# Altium PCB OpenRex_V1I1_PCB.PcbDoc (part 7 of 12)
Units mm, origin at the board's own origin, x right, y up, seen from the top; angles counter-clockwise.
Board outline 70 x 95 mm, 10 copper layers (L1, L2, L3, L4 (PWR), L5 (PWR), L6 (PWR), L7 (PWR), L8, L9, L10), stack 1.632 mm thick; 1080 components, 708 nets, 3831 pads, 2373 vias.
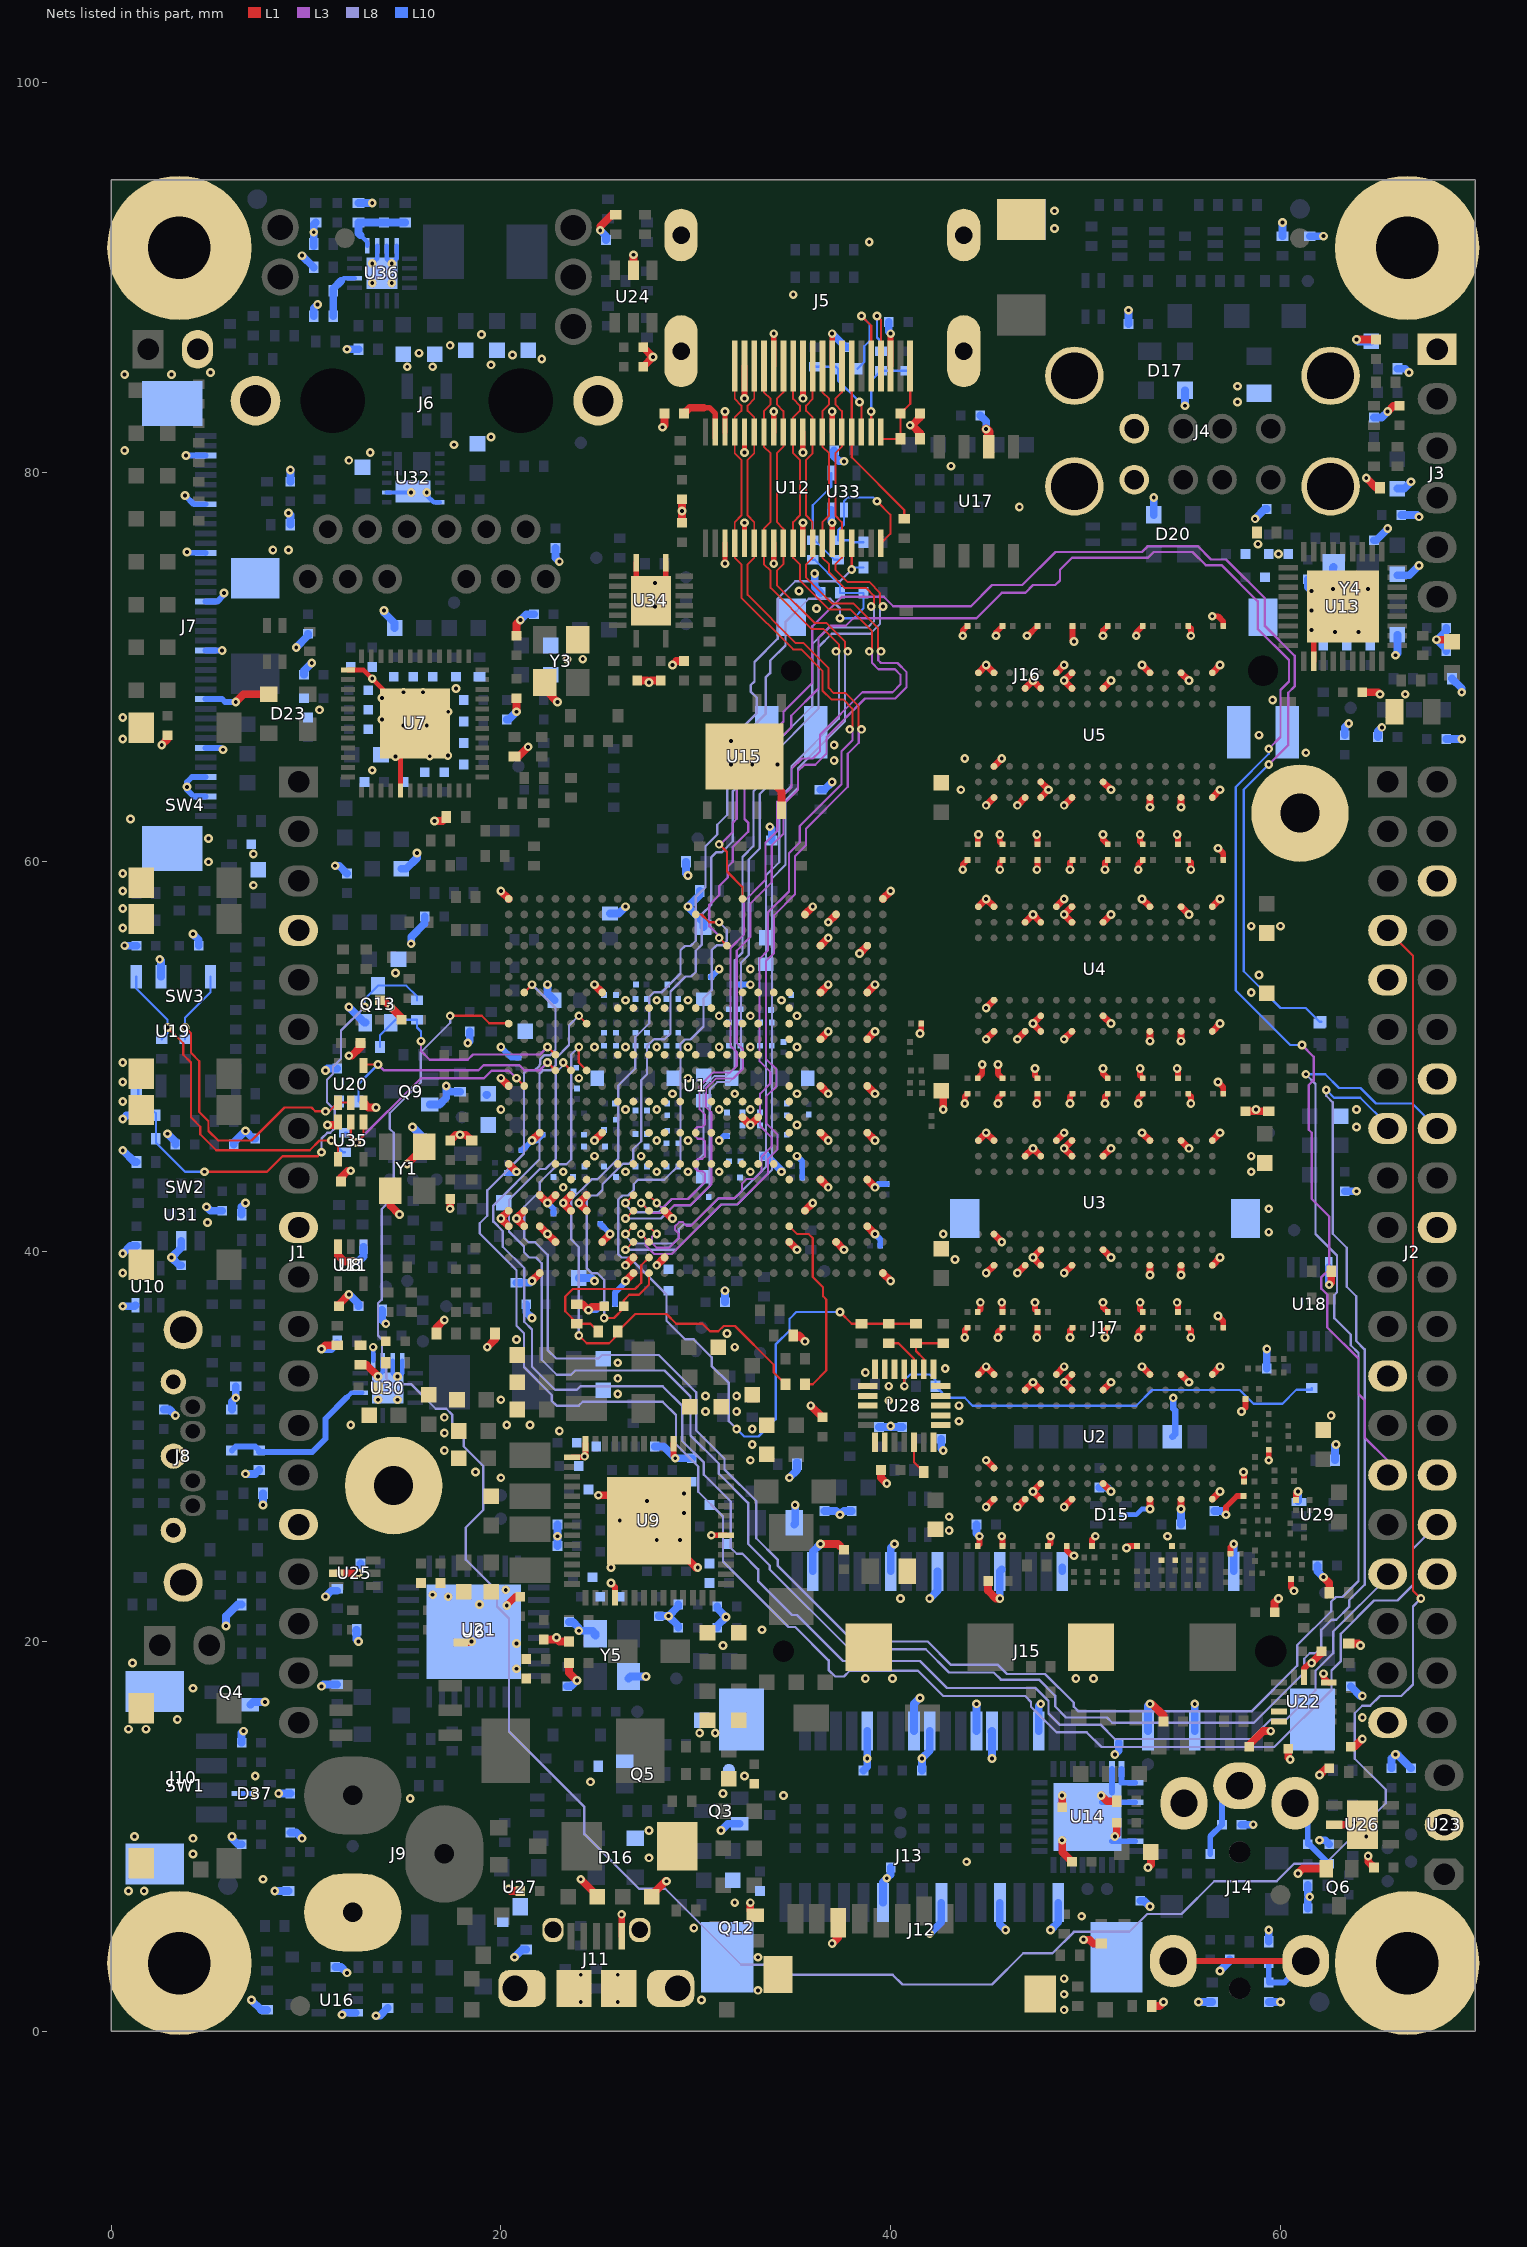
[diagram p15: the nets of this part, all layers, seen from the top]

## Via types
v1: diameter 0.45, hole 0.2, L1 to L10, tented both sides, 2369 vias
v2: diameter 1, hole 0.5, L1 to L10, tented top, 4 vias

## Nets (pads, with @x,y where several pads share a name; then routed paths per layer and width w, separated by ;. In a path a pad name is that pad's centre, name@x,y a point inside that pad or via, vN(x,y) a via of type N, cw(c..) or ccw(c..) an arc to the next point about the centre after c; other vN are vias at no path point) (continued)
FB_1V375: C410.1 R336.1 R339.2 U30.9 | length 0.7
  L10 w0.23: U30.9@13.45,34.4 U30.9@13.45,34.41 v1(13.45,35.1)
FB_3V3_HDR: C432.1 R399.1 R402.2 U36.9 | length 3.8
  L10 w0.23: 12.8,92.15 13.15,91.8 U36.9@13.15,91.61
  L10 w0.4: 12.8,92.15 12.7,92.25 R402.2@12.7,92.8 C432.1@14,92.8 R399.1@15.1,92.8
FIL_HP_OUTL: C287.1 FB22.2 J14.3 J14.4 | length 10.3
  L1 w0.3: J14.3@54.5,3.6 J14.4@61.3,3.6
  L10 w0.3: FB22.2@59.4,3.6 FB22.2@59.4,3.5 C287.1@59.4,2.5 60.2,2.5 J14.4@61.3,3.6
FIL_HP_OUTR: C286.1 FB21.2 J14.2 | length 3.9
  L10 w0.3: J14.2@60.75,11.7 61.4,11.05 FB21.2@61.4,9.6 61.479,9.6 62.479,8.6 C286.1@62.5,8.6
FIL_MIC_IN: C295.1 FB18.2 J14.1 | length 4.1
  L10 w0.3: FB18.2@56.4,9.1 56.4,10 C295.1@57,10.6 57,11.7 J14.1@57.9,12.6
FLEXCAN1_RX: R412.1 U1.D14 U20.4 | length 12.8
  L1 w0.114: U20.4@12.95,49.55 13,49.6 v1(13.7,49.6) ; v1(22.4,49.7) U1.D14@22.8,49.3
  L3 w0.12: v1(13.7,49.6) 14,49.3 18.845,49.3 19.11,49.565 20.95,49.565 21.2,49.315 22.015,49.315 v1(22.4,49.7)
  L10 w0.114: R412.1@12.7,47.7 12.7,48.6 v1(13.7,49.6)
FLEXCAN1_RX_BUFF: R117.1 R412.2 U19.4 U20.1 U20.2 | length 18.9
  L1 w0.114: v1(3.8,51.5) 4.1,51.2 4.1,50.2 4.53,49.77 4.53,47.17 5.004,46.696 5.004,46.196 5.496,45.704 7.204,45.704 8.9,47.4 10.28,47.4 10.48,47.2 v1(11,47.2) 11.2,47.2 U20.1@11.65,47.65 U20.2@12.3,47.65
  L10 w0.114: R117.1@3.8,50.9 v1(3.8,51.5) 3.8,52 5.105,53.305 U19.4@5.105,54.1 ; v1(11,47.2) 11.2,47.2 R412.2@11.7,47.7
FLEXCAN1_STBY: Q13.1 R280.1 R413.1 U1.D15 | length 12
  L1 w0.114: v1(22.4,50.5) U1.D15@22.8,50.1
  L3 w0.12: v1(15.9,50.8) 15.9,50.3 16.355,49.845 18.3,49.845 18.57,50.115 22.015,50.115 v1(22.4,50.5)
  L10 w0.114: R280.1@13.8,50.5 13.8,51.1 14.6,51.9 R413.1@15.7,51.9 15.7,51.5 15.9,51.3 v1(15.9,50.8)
FLEXCAN1_STBY_Q: Q13.3 R250.2 R382.1 R413.2 U19.8 | length 25.4
  L1 w0.114: v1(4.8,44.1) 8,44.1 8.8,44.9 10.6,44.9 v1(10.8,45.1)
  L8 w0.12: v1(10.8,45.1) 10.8,45.8 11.1,46.1 11.244,46.1 11.485,46.341 11.485,47.259 11.078,47.667 11.078,48.822 11.385,49.129 11.385,49.485 11.8,49.9 11.8,51.344 13,52.544 v1(13,52.55)
  L10 w0.114: U19.8@1.395,48.5 1.395,48.005 2.3,47.1 R382.1@2.3,45.8 2.3,45.6 3.8,44.1 v1(4.8,44.1) ; v1(13,52.55) 13,52.95 Q13.3@13.7,53.65 15.15,53.65 15.7,53.1 R413.2@15.7,52.9
FLEXCAN1_TX: R411.1 U1.B13 U35.1 U35.2 | length 13.6
  L1 w0.114: U35.2@12.3,46.65 12.3,45.9 v1(12.6,45.6) 12.95,45.95 U35.1@12.95,46.65 ; v1(20.8,48.9) U1.B13@21.2,48.5
  L3 w0.12: v1(12.6,45.6) 15.9,48.9 19.135,48.9 19.52,49.285 20.415,49.285 v1(20.8,48.9)
  L10 w0.114: R411.1@12,46.1 12.1,46.1 v1(12.6,45.6)
FLEXCAN1_TX_BUFF: R41.1 R411.2 U19.1 U35.4 | length 19.5
  L1 w0.114: v1(2.9,51.5) 3.7,50.7 3.7,50.1 4.1,49.7 4.1,46.896 4.58,46.416 4.58,46.02 5.4,45.2 10.2,45.2 10.7,45.7 v1(11.3,45.7) 11.65,45.35 U35.4@11.65,44.75
  L10 w0.114: U19.1@1.295,54.1 1.295,53.505 2.9,51.9 v1(2.9,51.5) 2.9,51.2 R41.1@2.6,50.9 ; v1(11.3,45.7) 11.9,45.1 R411.2@12,45.1
FLEXCAN2_RX: J2.16 U1.F14 | length 110.1
  L1 w0.114: v1(24,50.5) 24,49.7 U1.F14@24.4,49.3
  L8 w0.12: v1(24,50.5) 23.615,50.115 23.615,44.741 23.359,44.485 22.925,44.485 22,43.56 22,43.1 21.2,42.3 21.2,40.7 21.415,40.485 21.759,40.485 22.4,39.844 22.4,34.956 22.841,34.515 25.015,34.515 25.2,34.7 28.1,34.7 30.018,32.782 30.018,30.838 31.475,29.38 31.475,28.825 33.1,27.2 33.1,25.3 34.2,24.2 34.2,23.9 38.1,20 41.9,20 43.1,18.8 45.5,18.8 45.965,18.335 47.921,18.335 49.4,16.856 49.4,16.656 49.641,16.415 58.515,16.415 60.86,18.76 60.86,19.816 62.6,21.556 62.6,22.044 62.841,22.285 63.185,22.285 64,23.1 64,34.8 63.6,35.2 63.6,35.744 62.754,36.591 62.754,37.769 62.9,37.915 62.9,39.8 61.8,40.9 61.8,48.6 v1(61.3,49.1)
  L10 w0.114: v1(61.3,49.1) 62.3,49.1 63,48.4 64.1,48.4 64.9,47.6 66.76,47.6 J2.16@68.04,46.32
FLEXCAN2_TX: J2.15 U1.E14 | length 105.6
  L1 w0.114: v1(23.2,49.7) U1.E14@23.6,49.3
  L8 w0.12: v1(23.2,49.7) 23.2,49.56 22.815,49.175 22.815,44.771 22.289,44.244 22,44.244 20.415,42.659 20.415,41.029 21.185,40.259 21.185,39.971 21.456,39.7 21.8,39.7 22.1,39.4 22.1,34.456 22.871,33.685 23.6,33.685 23.815,33.9 28.4,33.9 29.728,32.572 29.728,30.572 31.185,29.115 31.185,28.609 32.685,27.109 32.685,25.015 33.8,23.9 33.8,23.7 37.9,19.6 41.8,19.6 42.99,18.41 45.29,18.41 45.655,18.045 47.605,18.045 48.44,17.21 48.44,16.66 49,16.1 51.1,16.1 51.365,15.835 58.635,15.835 61.215,18.415 61.215,19.115 61.5,19.4 61.8,19.4 62.1,19.7 62.1,20.6 62.615,21.115 62.859,21.115 63.52,21.776 63.52,22.12 64.315,22.915 64.315,34.985 63.885,35.415 63.885,37.715 63.4,38.2 63.4,40.2 62.685,40.915 62.685,47.659 62.35,47.994 v1(62.35,48.3)
  L10 w0.114: v1(62.35,48.3) 62.75,47.9 64.094,47.9 65.5,46.494 J2.15@65.5,46.32
FS_1V375: R334.1 R337.2 U30.6 | length 8.8
  L10 w0.23: 12.1,32.528 12.322,32.75 U30.6@12.79,32.75 U30.6@12.9,32.75
  L10 w0.3: R334.1@6.2,29.8 6.4,30 7.4,30 R337.2@7.6,29.8 7.6,29.725 10.325,29.725 11,30.4 11,31.428 12.1,32.528
FS_3V3_HDR: R397.1 R400.2 U36.6 | length 2.8
  L10 w0.23: 11.8,89.8 11.95,89.95 U36.6@12.49,89.95 U36.6@12.5,89.95
  L10 w0.4: R400.2@11.4,88 R397.1@11.4,89.4 ; R397.1@11.4,89.3 R397.1@11.4,89.4 ; 11.8,89.8 R397.1@11.4,89.4
GND: C1.2 C2.2 C3.2 C4.2 C5.2 C6.2 C7.2 C8.2 C9.2 C10.2 C11.2 C12.2 C19.2 C21.2 C22.2 C23.2 C24.2 C25.2 C26.2 C27.2 C28.2 C29.2 C30.2 C31.2 C32.2 C33.2 C34.2 C35.2 C36.2 C37.2 C38.2 C39.2 C40.2 C41.2 C42.2 C43.2 C44.2 C45.2 C46.2 C47.2 C48.2 C49.2 C50.2 C51.2 C52.2 C53.2 C54.2 C55.2 C56.2 C57.2 C58.2 C59.2 C60.2 C61.2 C62.2 C64.2 C68.2 C73.2 C75.2 C76.2 C77.2 C78.2 C79.2 C80.2 C81.2 C82.2 C83.2 C84.2 C87.2 C88.2 C89.2 C90.2 C91.2 C92.2 C93.2 C94.2 C95.2 C96.2 C97.2 C98.2 C99.2 C100.2 C101.2 C102.2 C103.2 C104.2 C105.2 C106.2 C107.2 C108.2 C109.2 C110.2 C111.2 C112.2 C113.2 C114.2 C115.2 C116.2 C117.2 C118.2 C119.2 C120.2 C121.2 C122.2 C123.2 C124.2 C125.2 C126.2 C127.2 C128.2 C129.2 C130.2 C131.2 C132.2 C133.2 C134.2 C135.2 C136.2 C137.2 C138.2 C139.2 C140.2 C141.2 C142.2 C143.2 C144.2 C145.2 C146.2 C147.2 C148.2 C149.2 C150.2 C151.2 C152.2 C153.2 C154.2 C155.2 C156.2 C157.2 C158.2 C159.2 C160.2 C161.2 C162.2 C163.2 C164.2 C165.2 C166.2 C167.2 C168.2 C169.2 C170.2 C171.2 C172.2 C173.2 C174.2 C175.2 C176.2 C177.2 C178.2 C179.2 C180.2 C181.2 C182.2 C183.2 C184.2 C185.2 C186.2 C187.2 C188.2 C189.2 C190.2 C191.2 C192.2 C193.2 C194.2 C195.2 C196.2 C197.2 C198.2 C199.2 C200.2 C201.2 C202.2 C203.2 C204.2 C205.2 C207.2 C208.2 C209.2 C210.2 C211.2 C212.2 C213.2 C214.2 C215.2 C216.2 C217.2 C218.2 C219.2 C220.2 C221.2 C222.2 C223.1 C224.1 C225.2 C226.2 C227.2 C228.2 C229.2 C230.1 C231.2 C232.2 C233.2 C234.2 C235.2 C236.2 C237.2 C238.2 C239.2 C240.2 C242.2 C243.2 C244.2 C245.1 C246.2 C247.2 C248.2 C249.2 C250.2 C251.1 C252.2 C253.2 C254.2 C255.2 C256.2 C257.2 C258.2 C259.2 C260.2 C261.2 C262.2 C263.2 C264.2 C265.2 C266.2 C267.2 C268.2 C269.2 C270.2 C271.1 C272.1 C273.2 C274.1 C275.1 C276.1 C277.2 C278.2 C279.2 C280.2 C281.2 C282.2 C283.2 C286.2 C287.2 C288.2 C289.2 C292.2 C293.2 C295.2 C296.2 C297.2 C298.1 C299.2 C300.2 C301.2 C302.2 C303.2 C304.2 C305.2 C306.2 C307.2 C308.2 C309.1 C310.2 C311.2 C312.2 C313.2 C314.2 C315.2 C316.2 C317.2 C318.2 C319.2 C320.2 C321.2 C324.1 C325.2 C326.1 C329.2 C330.2 C331.2 C332.2 C333.2 C334.2 C335.2 C336.2 C337.2 C338.2 C339.2 C341.2 C342.2 C343.2 C344.2 C345.2 C346.2 C347.2 C348.2 C349.2 C350.2 C351.2 C352.2 C353.2 C354.2 C355.2 C356.2 C357.2 C358.2 C359.2 C360.2 C361.2 C362.2 C363.2 C364.2 C365.2 C366.2 C367.2 C368.2 C369.2 C370.2 C371.2 C372.2 C373.2 C374.2 C375.2 C376.2 C377.2 C378.2 C379.2 C380.2 C381.2 C382.2 C383.2 C384.2 C385.2 C386.2 C387.2 C388.2 C389.2 C391.2 C393.2 C394.2 C395.2 C396.2 C397.2 C398.2 C399.2 C400.2 C401.2 C402.2 C403.2 C404.2 C405.2 C406.2 C407.2 C408.2 C409.2 C412.2 C413.2 C414.2 C415.2 C416.2 C417.2 C418.2 C419.2 C420.2 C421.2 C422.2 C423.2 C424.2 C425.2 C426.2 C427.2 C428.2 C429.2 C430.2 C431.2 C434.2 C435.2 C436.2 C437.2 D4.2 D8.2 D12.1 D15.2 D16.3 D17.3 D19.2 D20.3 D23.3 D31.2 D32.2 D37.2 J1.4 J1.10 J1.16 J2.6 J2.9 J2.14 J2.20 J2.25 J2.30 J2.34 J2.39 J3.1 J4.4 J4.8 J4.9 J4.10 J4.11 J4.12 J5.2 J5.5 J5.8 J5.11 J5.17 J5.MTG1 J5.MTG2 J5.MTG3 J5.MTG4 J6.18 J6.19 J7.3 J7.5 J7.8 J7.13 J7.18 J7.23 J7.28 J7.33 J7.38 J7.41 J7.42 J8.1 J8.4 J8.7 J8.8 J8.9 J9.2 J10.5 J10.6 J11.5 J11.6 J11.7 J11.8 J11.9 J11.10 J11.11 J12.1 J12.4 J12.7 J12.10 J12.16 J12.17 J13.6 J13.11 J13.12 J14.6 J15.4 J15.9 J15.15 J15.18 J15.21 J15.26 J15.27 J15.29 J15.34 J15.35 J15.37 J15.40 J15.43 J15.50 J15.53 J15.54 J16.1 J16.2 J16.3 J16.4 J16.5 J16.6 J17.C5 J17.G1 J17.G2 JP2.2 MH1.1 MH2.1 MH3.1 MH4.1 MH5.1 MH6.1 Q3.2 Q4.2 Q5.2 Q6.2 Q9.2 Q12.2 Q13.2 R4.1 R5.1 R6.1 R7.1 R8.1 R9.1 R10.2 R16.1 R17.1 R20.2 R26.1 R30.1 R32.1 R37.1 R47.1 R54.1 R56.1 R58.1 R61.1 R84.2 R99.1 R101.1 R102.1 R115.2 R139.1 R144.1 R157.1 R160.1 R163.1 R164.1 R166.1 R174.1 R175.1 R182.2 R191.1 R199.1 R205.1 R210.1 R211.1 R216.2 R220.1 R221.1 R222.2 R223.1 R224.1 R230.1 R231.1 R232.1 R233.1 R234.2 R237.1 R239.1 R250.1 R259.1 R265.1 R274.1 R296.1 R301.1 R303.1 R305.1 R306.1 R307.1 R308.1 R309.1 R310.1 R311.2 R316.2 R337.1 R338.1 R339.1 R342.1 R343.1 R344.1 R346.1 R393.1 R394.1 R395.1 R396.1 R400.1 R401.1 R402.1 R406.1 R407.1 R408.1 SW1.3 SW1.4 SW2.3 SW2.4 SW3.3 SW3.4 SW4.3 SW4.4 TP10.1 U1.A4 U1.A5 U1.A8 U1.A13 U1.A25 U1.AA7 U1.AA10 U1.AA13 U1.AA16 U1.AA19 U1.AA22 U1.AB3 U1.AB24 U1.AD4 U1.AD7 U1.AD10 U1.AD13 U1.AD16 U1.AD19 U1.AD22 U1.AE1 U1.AE25 U1.B4 U1.B5 U1.C1 U1.C4 U1.C6 U1.C10 U1.D3 U1.D6 U1.D8 U1.E5 U1.E6 U1.E7 U1.F5 U1.F6 U1.F7 U1.F8 U1.G3 U1.G10 U1.G19 U1.H8 U1.H12 U1.H15 U1.H18 U1.J2 U1.J8 U1.J12 U1.J15 U1.J18 U1.K8 U1.K10 U1.K12 U1.K15 U1.K18 U1.L2 U1.L5 U1.L8 U1.L10 U1.L12 U1.L15 U1.L18 U1.M8 U1.M10 U1.M12 U1.M15 U1.M18 U1.N8 U1.N10 U1.N15 U1.N18 U1.P8 U1.P10 U1.P12 U1.P15 U1.P18 U1.R8 U1.R12 U1.R15 U1.R17 U1.T8 U1.T11 U1.T12 U1.T15 U1.T17 U1.T19 U1.U8 U1.U11 U1.U12 U1.U15 U1.U17 U1.U19 U1.V8 U1.V19 U1.W3 U1.W7 U1.W8 U1.W9 U1.W10 U1.W11 U1.W12 U1.W13 U1.W15 U1.W16 U1.W17 U1.W18 U1.W19 U1.Y5 U1.Y24 U2.A9 U2.B1 U2.B3 U2.B9 U2.D1 U2.D8 U2.E1 U2.E2 U2.E8 U2.F9 U2.G1 U2.G8 U2.G9 U2.J2 U2.J8 U2.M1 U2.M9 U2.P1 U2.P9 U2.T1 U2.T9 U3.A9 U3.B1 U3.B3 U3.B9 U3.D1 U3.D8 U3.E1 U3.E2 U3.E8 U3.F9 U3.G1 U3.G8 U3.G9 U3.J2 U3.J8 U3.M1 U3.M9 U3.P1 U3.P9 U3.T1 U3.T9 U4.A9 U4.B1 U4.B3 U4.B9 U4.D1 U4.D8 U4.E1 U4.E2 U4.E8 U4.F9 U4.G1 U4.G8 U4.G9 U4.J2 U4.J8 U4.M1 U4.M9 U4.P1 U4.P9 U4.T1 U4.T9 U5.A9 U5.B1 U5.B3 U5.B9 U5.D1 U5.D8 U5.E1 U5.E2 U5.E8 U5.F9 U5.G1 U5.G8 U5.G9 U5.J2 U5.J8 U5.M1 U5.M9 U5.P1 U5.P9 U5.T1 U5.T9 U6.33 U7.13 U7.29 U7.49 U8.3 U9.5 U9.14 U9.15 U9.32 U9.48 U9.57 U10.3 U11.3 U12.3 U12.5 U12.8 U12.11 U12.14 U12.25 U12.28 U12.31 U12.34 U12.36 U13.11 U13.37 U14.1 U14.3 U14.7 U14.31 U14.32 U14.33 U15.4 U15.9 U16.3 U17.6 U18.4 U19.2 U20.3 U21.3 U22.5 U22.7 U22.12 U22.13 U23.2 U24.2 U25.2 U26.2 U26.7 U27.3 U28.1 U28.5 U28.6 U28.7 U28.8 U28.9 U28.10 U28.13 U28.14 U28.19 U28.20 U28.21 U28.22 U28.23 U28.24 U29.3 U30.10 U30.11 U30.12 U30.17 U31.2 U32.2 U32.12 U32.13 U33.3 U34.8 U34.9 U34.17 U35.3 U36.10 U36.11 U36.12 U36.17 Y1.2 Y1.4 Y3.2 Y3.4 Y4.2 Y4.4 Y5.2 Y5.4 | length 422
  L1 w0.25: U7.13@12.16,69.85 12.95,69.85 v1(13.4,69.4) 15.6,67.2 U7.49@15.6,67.1 14.85,66.35 U7.29@14.85,63.66
  L1 w0.28: U34.17@26.95,74.15 U34.9@26.95,75.35 ; U34.17@28.45,74.15 U34.8@28.45,75.35 ; v1(31.5,75.3) U12.3@31.5,76.35 ; U12.36@31.5,82.05 v1(31.5,83.1) ; U12.5@32.5,76.05 v1(32.5,77.4) ; v1(32.5,81) U12.34@32.5,82.05 ; v1(34,75.3) U12.8@34,76.35 ; U12.31@34,82.05 v1(34,83.1) ; U12.11@35.5,76.05 v1(35.5,77.4) ; v1(35.5,81) U12.28@35.5,82.05 ; U12.14@37,76.05 U12.14@37,76.35 v1(37,77.4) ; U12.25@37,82.05 v1(37,83.1) ; U13.11@61.7,70.3 U13.37@61.7,71.6
  L1 w0.3: U9.15@23.65,29.45 24.25,29.45 24.35,29.55 U9.14@24.35,30.15 ; v1(25.65,23) 25.85,22.8 U9.32@25.85,22.25 ; U9.5@28.85,30.15 28.85,29.5 v1(28.95,29.4) ; v1(30.8,25.45) U9.48@31.55,25.45 ; v1(32.5,83.78) J5.2@32.5,85.44 ; J5.5@34,85.44 v1(34,87.1) ; v1(35.5,83.78) J5.8@35.5,85.44 ; J5.11@37,85.44 v1(37,87.1) ; J5.17@40,85.44 v1(40,87.1) ; v1(41.5,51.2) 41.565,51.265 R10.2@41.565,51.7 ; v1(43.7,59.6) 43.7,59.865 C49.2@43.935,60.1 ; v1(43.7,71.6) 43.7,71.865 C59.2@43.935,72.1 ; v1(43.8,35.6) 43.8,35.965 C23.2@43.935,36.1 ; v1(43.8,47.6) 43.8,47.965 C39.2@43.935,48.1 ; C1.2@44.465,24.9 44.55,24.985 v1(44.55,25.4) ; C34.2@44.465,36.9 44.6,37.035 v1(44.6,37.4) ; C44.2@44.465,48.9 44.7,49.135 v1(44.7,49.6) ; C54.2@44.465,60.9 44.465,61.365 v1(44.5,61.4) ; v1(45.4,71.6) 45.4,71.765 C60.2@45.735,72.1 ; v1(45.5,35.6) 45.5,35.865 C24.2@45.735,36.1 ; v1(45.5,47.6) 45.5,47.865 C40.2@45.735,48.1 C40.2@45.6,47.965 ; v1(45.5,49.6) 45.5,49.135 C45.2@45.735,48.9 ; v1(45.6,59.6) 45.6,59.965 C50.2@45.735,60.1 ; v1(45.6,61.4) 45.6,61.035 C55.2@45.735,60.9 ; v1(45.7,25.4) 45.735,25.365 C2.2@45.735,24.9 ; v1(45.7,37.4) 45.735,37.365 C35.2@45.735,36.9 ; v1(47,71.6) 47.035,71.6 C203.2@47.535,72.1 ; v1(47.4,37.4) 47.4,37.035 C5.2@47.535,36.9 ; v1(47.4,49.4) 47.4,49.035 C8.2@47.535,48.9 ; v1(47.5,35.6) 47.535,35.635 C25.2@47.535,36.1 ; v1(47.5,59.6) 47.535,59.635 C51.2@47.535,60.1 ; v1(47.5,61.4) 47.535,61.365 C10.2@47.535,60.9 ; v1@47.535,47.735 C41.2@47.535,48.1 ; C4.2@48.065,24.9 48.2,25.035 v1(48.2,25.4) ; C12.2@49.035,24.9 49.035,24.665 49.3,24.4 v1(49.4,24.4) ; v1(49.2,35.6) 49.2,35.965 R4.1@49.335,36.1 ; v1(49.2,47.6) 49.2,47.965 R5.1@49.335,48.1 ; v1(49.2,59.6) 49.2,59.965 R8.1@49.335,60.1 ; R9.1@49.335,72.1 49.335,71.365 v1(49.4,71.3) ; C319.2@50.335,24.9 50.335,25.235 v1(50.5,25.4) ; v1(50.9,37.4) 50.9,37.135 C36.2@51.135,36.9 C36.2@51,37.035 ; v1(50.9,49.4) 50.9,49.135 C46.2@51.135,48.9 C46.2@51,49.035 ; v1(50.9,61.4) 50.9,61.135 C56.2@51.135,60.9 ; v1(50.9,71.6) 50.9,71.865 R309.1@51.135,72.1 ; v1(51,35.6) 51,35.965 R306.1@51.135,36.1 ; v1(51,47.6) 51,47.965 R307.1@51.135,48.1 ; v1(51,59.6) 51,59.965 R308.1@51.135,60.1 ; v1(52.1,24.8) 52.2,24.9 C21.2@52.635,24.9 ; v1(52.6,71.6) 52.6,71.765 C11.2@52.935,72.1 ; v1(52.7,35.6) 52.7,35.865 C3.2@52.935,36.1 C3.2@52.8,35.965 ; v1(52.7,47.6) 52.7,47.865 C6.2@52.935,48.1 C6.2@52.8,47.965 ; v1(52.7,59.6) 52.7,59.865 C9.2@52.935,60.1 C9.2@52.8,59.965 ; v1(52.8,37.4) 52.8,37.035 C37.2@52.935,36.9 ; v1(52.8,49.4) 52.8,49.035 C47.2@52.935,48.9 ; v1(52.8,61.4) 52.8,61.035 C57.2@52.935,60.9 ; v1(54.7,37.4) 54.735,37.365 C38.2@54.735,36.9 ; v1(54.7,49.4) 54.735,49.365 C48.2@54.735,48.9 ; v1(54.7,61.4) 54.735,61.365 C58.2@54.735,60.9 ; C26.2@55.265,36.1 55.4,35.965 v1(55.4,35.6) ; C42.2@55.265,48.1 55.4,47.965 v1(55.4,47.6) ; C52.2@55.265,60.1 55.4,59.965 v1(55.4,59.6) ; C204.2@55.265,72.1 55.4,71.965 v1(55.4,71.6) ; v1(56.5,72.6) 56.8,72.6 57.065,72.335 C205.2@57.065,72.1 ; v1(56.8,36.7) 57.065,36.435 C30.2@57.065,36.1 ; v1(56.8,48.7) 57.065,48.435 C43.2@57.065,48.1 ; v1(56.8,60.7) 57.065,60.435 C53.2@57.065,60.1 ; v1(57.2,26.5) 57.2,26.9 57.765,27.465 C306.2@58.1,27.465 ; C317.2@57.435,24.5 57.435,24.835 v1(57.6,25) ; v1(58,31.8) 58.2,32 C229.2@58.2,32.435 ; v1(58.1,28.7) 58.135,28.665 C297.2@58.135,28.2 ; v1(59.4,29.3) C277.2@59.4,29.835 ; C308.2@60.535,23.2 60.535,22.765 v1(60.7,22.6) ; C305.2@60.8,27.265 60.8,27.6 v1(60.9,27.7) ; U22.7@61.2,18.175 61.2,18.6 v1@61.5,18.9 ; v1(62.2,18.35) 62.2,18.175 U22.5@62.475,17.9
  L1 w0.35: U21.3@17.95,19.95 18.45,19.95 v1(18.5,20) ; v1(20.3,21.85) 20.75,22.3 C385.2@21,22.3 ; J11.5@26.2,4.875 v1(26.2,6) ; U2.A9@44.5,33.7 v1(44.9,34.1) U2.B9@45.3,33.7 ; U3.A9@44.5,45.7 v1(44.9,46.1) U3.B9@45.3,45.7 ; U4.A9@44.5,57.7 v1(44.9,58.1) U4.B9@45.3,57.7 ; U5.A9@44.5,69.7 v1(44.9,70.1) U5.B9@45.3,69.7 ; v1(44.9,26.9) U2.B1@45.3,27.3 ; v1(44.9,29.3) U2.B3@45.3,28.9 ; v1(44.9,38.9) U3.B1@45.3,39.3 ; v1(44.9,50.9) U4.B1@45.3,51.3 ; v1(44.9,52.5) U4.B3@45.3,52.9 ; v1(44.9,62.9) U5.B1@45.3,63.3 ; U3.B3@45.3,40.9 v1(45.7,40.5) ; U5.B3@45.3,64.9 v1(45.7,65.3) ; v1(46.5,26.9) U2.D1@46.9,27.3 ; v1(46.5,38.9) U3.D1@46.9,39.3 ; v1(46.5,50.9) U4.D1@46.9,51.3 ; v1(46.5,62.9) U5.D1@46.9,63.3 ; U2.D8@46.9,32.9 v1(47.3,33.3) U2.E8@47.7,32.9 ; U3.D8@46.9,44.9 v1(47.3,45.3) U3.E8@47.7,44.9 ; U4.D8@46.9,56.9 v1(47.3,57.3) U4.E8@47.7,56.9 ; U5.D8@46.9,68.9 47.3,69.3 U5.E8@47.7,68.9 ; U2.E1@47.7,27.3 v1(47.3,27.7) U2.E2@47.7,28.1 ; U3.E1@47.7,39.3 v1(47.3,39.7) U3.E2@47.7,40.1 ; U4.E1@47.7,51.3 v1(47.3,51.7) U4.E2@47.7,52.1 ; U5.E1@47.7,63.3 v1(48.1,63.7) U5.E2@47.7,64.1 ; U2.F9@48.5,33.7 v1(48.9,34.1) ; U3.F9@48.5,45.7 v1(48.9,46.1) ; U4.F9@48.5,57.7 v1(48.9,58.1) ; U5.F9@48.5,69.7 v1(48.9,70.1) ; v1(48.9,26.9) U2.G1@49.3,27.3 ; v1(48.9,38.9) U3.G1@49.3,39.3 ; v1(48.9,50.9) U4.G1@49.3,51.3 ; v1(48.9,62.9) U5.G1@49.3,63.3 ; U2.G8@49.3,32.9 v1(48.9,33.3) U2.G9@49.3,33.7 ; U3.G8@49.3,44.9 v1(48.9,45.3) U3.G9@49.3,45.7 ; U4.G8@49.3,56.9 v1(48.9,57.3) U4.G9@49.3,57.7 ; U5.G8@49.3,68.9 v1(48.9,69.3) U5.G9@49.3,69.7 ; U2.J2@50.9,28.1 v1(51.3,27.7) ; U2.J8@50.9,32.9 v1(51.3,33.3) ; U3.J2@50.9,40.1 v1(51.3,39.7) ; U3.J8@50.9,44.9 v1(51.3,45.3) ; U4.J2@50.9,52.1 v1(51.3,51.7) ; U4.J8@50.9,56.9 v1(51.3,57.3) ; U5.J2@50.9,64.1 v1(51.3,63.7) ; U5.J8@50.9,68.9 v1(51.3,69.3) ; v1(52.9,34.1) U2.M9@53.3,33.7 ; v1(52.9,46.1) U3.M9@53.3,45.7 ; v1(52.9,58.1) U4.M9@53.3,57.7 ; v1(52.9,70.1) U5.M9@53.3,69.7 ; v1(53.3,26.8) U2.M1@53.3,27.3 ; v1(53.3,38.8) U3.M1@53.3,39.3 ; v1(53.3,50.8) U4.M1@53.3,51.3 ; v1(53.3,62.8) U5.M1@53.3,63.3 ; v1(54.9,26.8) U2.P1@54.9,27.3 ; U2.P9@54.9,33.7 v1(55.3,33.3) ; v1(54.9,38.8) U3.P1@54.9,39.3 ; U3.P9@54.9,45.7 v1(55.3,45.3) ; v1(54.9,50.8) U4.P1@54.9,51.3 ; U4.P9@54.9,57.7 v1(55.3,57.3) ; v1(54.9,62.8) U5.P1@54.9,63.3 ; U5.P9@54.9,69.7 v1(55.3,69.3) ; U2.T1@56.5,27.3 v1(56.9,27.7) ; U2.T9@56.5,33.7 v1(56.9,34.1) ; U3.T1@56.5,39.3 v1(56.9,39.7) ; U3.T9@56.5,45.7 v1(56.9,46.1) ; U4.T1@56.5,51.3 v1(56.9,51.7) ; U4.T9@56.5,57.7 v1(56.9,58.1) ; U5.T1@56.5,63.3 v1(56.9,63.7) ; U5.T9@56.5,69.7 v1(56.9,70.1)
  L1 w0.4: v1(2.6,66) 2.9,66.3 C307.2@2.9,66.5 ; v1(6.4,68.2) 6.8,68.6 D23.3@8.1,68.6 ; v1(10.8,35) 11,35.2 R144.1@11.6,35.2 ; v1(11.1,46.5) 11.5,46.5 U35.3@11.65,46.65 ; U25.2@11.55,23.5 v1@12.6,23.5 ; U11.3@11.65,40.25 11.65,39.8 11.95,39.5 v1(12.4,39.5) ; C386.2@11.7,37.2 11.7,37.306 v1@12.197,37.803 ; C423.2@11.8,43.6 11.8,43.8 12.15,44.15 v1(12.3,44.15) ; v1(12.2,50.05) 12.35,50.05 12.8,50.5 C310.2@12.8,50.7 ; R339.1@12.8,34.2 13.1,34.2 v1(13.7,33.6) ; U20.3@12.95,47.65 13.2,47.4 v1(13.6,47.4) ; C315.2@13.8,52.9 14,52.9 v1(14.35,52.55) 14.9,52 C316.2@14.9,51.9 ; Y1.4@14.325,43.125 14.325,42.375 v1(14.8,41.9) ; v1(15.2,44.5) Y1.2@16.075,45.375 ; v1(16.6,62.1) 17,62.1 R101.1@17.2,62.3 ; R17.1@16.7,35.8 16.7,36.1 v1(17.1,36.5) ; v1(17.4,42.2) C84.2@17.4,42.7 ; C83.2@17.4,45.7 17.7,46 v1(17.9,46) 18.2,46 R20.2@18.5,45.7 ; v1(19.3,35.1) 19.7,35.5 R16.1@19.7,35.8 ; v1(20,48.9) U1.A13@20.4,48.5 ; v1(20,58.5) U1.A25@20.4,58.1 ; v1(20.4,7.3) 20.5,7.2 C232.2@21,7.2 ; U1.A4@20.4,41.3 v1(20,41.7) U1.A5@20.4,42.1 ; U1.A8@20.4,44.5 v1(20.8,44.1) ; R30.1@20.7,65.4 20.9,65.4 v1(21.4,65.9) ; v1(20.8,67.7) C176.2@20.8,68.4 ; C175.2@20.8,71.6 20.8,72.2 v1(21,72.4) ; U1.B4@21.2,41.3 v1(20.8,41.7) U1.B5@21.2,42.1 ; v1(21.6,38.5) U1.C1@22,38.9 ; v1(21.6,45.7) U1.C10@22,46.1 ; U1.C4@22,41.3 v1(22.4,40.9) U1.D3@22.8,40.5 ; U1.C6@22,42.9 v1(22.4,42.5) U1.D6@22.8,42.9 ; C342.2@22.2,20.1 22.9,20.1 23,20 C437.2@23.5,20 ; Y3.4@22.25,69.2 22.25,68.85 v1(22.9,68.2) ; C339.2@23.5,18.9 23.5,18.4 v1(23.9,18) ; U1.E5@23.6,42.1 v1(23.2,42.5) U1.E6@23.6,42.9 ; R26.1@23.9,37.3 24.2,37.3 v1(24.5,37) 24.675,37.175 25.3,37.175 C207.2@25.3,37.2 ; v1(24.1,7.8) 24.95,6.95 C231.2@24.95,6.9 ; U1.F5@24.4,42.1 v1(24,42.5) U1.F6@24.4,42.9 ; v1(24.8,45.7) U1.G10@25.2,46.1 ; v1(24.8,53.7) U1.G19@25.2,53.3 ; v1(25,27.5) 26.3,27.5 U9.57@27.6,26.2 30,23.8 v1(30.1,23.8) ; v1(25.1,92.4) 25.1,92.6 25.7,93.2 R259.1@25.9,93.2 ; U1.G3@25.2,40.5 v1(25.6,40.9) ; v1(26.4,39.3) U1.J2@26.8,39.7 ; U24.2@26.8,90.45 v1(26.8,91.15) ; C418.2@27,69.3 27.5,69.3 v1(27.6,69.2) 27.7,69.3 C417.2@28.2,69.3 ; C326.1@27.3,85.4 v1(27.8,85.9) C396.2@27.3,86.4 ; D19.2@27.65,6.9 v1@28.475,7.725 ; v1(28,39.3) U1.L2@28.4,39.7 ; v1(28.3,82.3) 28.4,82.4 C215.2@28.4,83 ; U1.L5@28.4,42.1 v1(28.8,41.7) ; v1(28.8,70.1) 29,70.3 C384.2@29.4,70.3 ; C213.2@29.3,77.4 v1(29.3,78) C214.2@29.3,78.6 ; U1.T11@32.4,46.9 v1(32.8,46.5) U1.U11@33.2,46.9 ; U15.9@32.6,65.4 34.405,63.595 U15.4@34.405,62.65 U15.4@34.405,62.405 ; v1(32.8,6.6) 32.8,6.2 Q12.2@33.05,5.95 ; U1.W3@34.8,40.5 v1(35.2,40.1) ; R139.1@35,35.7 35.3,35.7 v1(35.6,35.4) ; U1.Y5@35.6,42.1 v1(36,42.5) ; U1.Y24@35.6,57.3 v1(36,57.7) ; v1(35.9,32.1) C404.2@36.5,31.5 ; v1(36.4,25) 37.3,25 C368.2@37.6,24.7 ; U1.AA7@36.4,43.7 v1(36.8,43.3) ; U1.AA10@36.4,46.1 v1(36.8,45.7) ; U1.AA13@36.4,48.5 v1(36.8,48.1) ; U1.AA16@36.4,50.9 v1(36.8,51.3) ; U1.AA19@36.4,53.3 v1(36.8,53.7) ; U1.AA22@36.4,55.7 v1(36.8,56.1) ; v1(36.8,56.9) U1.AB24@37.2,57.3 ; v1(37,4.5) 37.315,4.815 J13.6@37.315,5.575 ; U1.AB3@37.2,40.5 v1(37.6,40.1) ; v1(38.4,55.3) U1.AD22@38.8,55.7 ; U1.AD4@38.8,41.3 v1(39.2,40.9) ; U1.AD7@38.8,43.7 v1(39.2,43.3) ; U1.AD10@38.8,46.1 v1(39.2,45.7) ; U1.AD13@38.8,48.5 v1(39.2,48.1) ; U1.AD16@38.8,50.9 v1(39.2,51.3) ; U1.AD19@38.8,53.3 v1(39.2,53.7) ; C403.2@39.5,28.8 39.5,28.4 v1(39.8,28.1) ; U1.AE1@39.6,38.9 v1(40,38.5) ; U1.AE25@39.6,58.1 v1(40,58.5) ; v1(41,82.4) v1@41.1,82.4 ; R47.1@41.5,81.7 41.5,82 v1@41.1,82.4 ; C217.2@41.5,83 41.5,82.8 v1@41.1,82.4 ; C33.2@42.6,48.25 42.7,48.15 v1(42.7,47.3) ; C267.2@45,23.1 45,22.6 45.4,22.2 v1(45.6,22.2) ; v1(48.8,9.8) 48.8,9.2 C292.2@49.3,8.7 ; C281.2@48.8,11.5 v1(48.8,12.1) ; v1(49.9,4.7) 50.2,4.7 50.4,4.5 R54.1@50.8,4.5 ; v1(50.8,12.1) 51.1,11.8 R234.2@51.6,11.8 ; v1(51.5,10) 51.6,10.1 C283.2@51.6,10.7 ; v1(53.2,8.4) 53.35,8.55 C280.2@53.35,9.2 ; v1(53.3,16.8) 53.4,16.8 54,16.2 C264.2@54,15.9 ; R191.1@53.4,1.3 53.8,1.3 v1(54,1.5) ; C393.2@58.2,47.2 58.65,47.2 v1(58.75,47.3) 58.85,47.2 R274.1@59.4,47.2 ; C388.2@58.4,14.6 58.4,14.7 59.1,15.4 v1(59.5,15.4) ; C268.2@59.7,21.5 59.7,22 v1(59.9,22.2) ; C391.2@60.4,14.5 60.4,14.05 v1(60.5,13.95) ; v1(60.9,8.1) 61.15,8.35 Q6.2@62.35,8.35 ; v1(61.6,18.9) 62.1,19.4 C399.2@62.1,19.5 ; v1(62,13.15) 62.35,13.5 C389.2@62.5,13.5 ; v1(62.2,23.3) 62.5,23 R316.2@62.5,22.5 ; v1(62.5,38.3) 62.6,38.4 R115.2@62.6,39 ; U26.2@62.75,10.6 U26.7@64.2,10.6 ; R311.2@63.5,19.9 64,19.9 v1(64.1,19.8) ; C398.2@63.6,14.6 63.8,14.6 v1(64.2,15) ; v1(63.9,86.8) C416.2@64.9,86.8 ; C254.2@64.2,68.7 65,68.7 v1(65.1,68.6) ; v1(64.4,79.7) R216.2@64.9,79.2 ; v1(64.5,9) 64.5,8.7 C329.2@64.8,8.4 ; v1(65.5,83.1) 65.8,83.4 C237.2@66.1,83.4 ; v1(68,71.4) 68.7,71.4 D12.1@68.8,71.3
  L1 w0.5: v1(44.9,82.2) 45.035,82.065 U17.6@45.035,81.3
  L10 w0.23: v1(13.4,90.7) 13.65,90.95 U36.10@13.65,91.61 ; v1(13.7,33.6) 13.95,33.85 U30.10@13.95,34.41 ; U32.2@14.14,78.95 v1(15.4,78.95) ; U36.11@14.15,91.61 14.15,90.95 v1(14.4,90.7) 14.65,90.95 U36.12@14.65,91.6 ; U30.11@14.45,34.4 14.45,33.75 14.7,33.5 14.95,33.75 U30.12@14.95,34.4 ; v1(16.2,78.95) 16.2,78.8 16.55,78.45 U32.12@16.86,78.45
  L10 w0.25: D37.2@6.675,12.2 v1(7.4,12.2) ; D15.2@52.125,26.5 52.6,26.5 52.9,26.8 v1(53.3,26.8)
  L10 w0.3: v1(3.8,78.8) 4.25,78.35 J7.33@4.85,78.35 ; v1(3.85,80.85) J7.38@4.85,80.85 ; v1(3.9,75.9) 3.945,75.855 4.85,75.855 J7.28@4.85,75.85 ; J7.3@4.85,63.35 4.25,63.35 3.9,63.7 v1(3.9,63.85) 3.9,64.1 4.15,64.35 J7.5@4.85,64.35 ; J7.8@4.85,65.85 5.65,65.85 v1(5.75,65.75) ; J7.13@4.85,68.35 5.7,68.35 5.85,68.2 v1(6.4,68.2) ; J7.18@4.85,70.85 v1(5.7,70.85) ; J7.23@4.85,73.35 5.45,73.35 5.8,73.7 v1(5.8,73.8) ; v1(20,50.5) 20.535,49.965 R99.1@20.9,49.965 ; C211.2@20.3,44.035 20.735,44.035 v1(20.8,44.1) ; C212.2@21.065,45.2 21.1,45.2 v1(21.6,45.7) 21.835,45.7 R56.1@22.135,46 ; v1(22.4,42.5) 22.7,42.2 R160.1@22.7,41.965 ; v1(24.5,37) 24.9,37 25.2,37.3 R32.1@25.335,37.3 ; R61.1@25.1,41.435 25.6,40.935 v1(25.6,40.9) ; C144.2@30.765,54.1 30.8,54.1 v1(31.2,54.5) ; v1(31.2,45.7) 31.435,45.935 C105.2@31.6,45.935 ; C155.2@32.265,53.7 v1(32.8,53.7) ; v1(35.2,44.9) 35.465,44.635 C157.2@35.465,44.4 C79.2@35.465,43.8 ; v1(39.2,40.9) 39.465,40.635 C7.2@39.465,40.3 ; v1(39.2,43.3) 39.365,43.465 R7.1@39.8,43.465 ; U14.33@50.85,11.75 U14.3@52.55,11.75 ; U14.33@51.35,9.75 U14.7@52.55,9.75 ; U14.33@51.35,12.25 U14.31@51.35,13.45 ; U14.32@51.85,13.45 51.85,12.75 U14.1@52.55,12.75
  L10 w0.35: J17.C5@54.45,30.5 54.6,30.65 54.6,31.857 54.5,31.957 v1(54.5,32.5)
  L10 w0.4: v1(0.6,37.2) 1.2,37.2 U10.3@1.25,37.25 ; v1(0.6,39.9) 1,40.3 C413.2@1.3,40.3 ; v1(0.6,45.2) 1.2,44.6 R303.1@1.3,44.6 ; v1(0.6,46.8) 0.8,47 R250.1@1.3,47 ; v1(0.7,55.7) C397.2@1.3,55.7 ; v1(2.5,55) 2.565,54.935 U19.2@2.565,54.1 ; C382.2@2.7,31.9 3,31.9 v1(3.3,31.6) ; v1(2.9,46.05) 3.3,45.65 C311.2@3.3,45.5 ; C87.2@3.6,39.3 3.5,39.3 v1(3.1,39.7) 3.6,40.2 U31.2@3.6,40.55 ; v1(4.2,56.3) 4.5,56 C309.1@4.5,55.7 ; v1(4.9,42.3) 5.1,42.1 C412.2@5.7,42.1 ; v1(5.9,20.8) 5.9,21.3 6.5,21.9 R239.1@6.7,21.9 ; v1(6.2,10) 6.2,9.9 6.5,9.6 C178.2@6.7,9.6 ; R205.1@6.2,31.9 6.2,32.3 v1(6.4,32.5) R211.1@6.4,33.1 ; C312.2@6.3,45.5 6.3,45.6 v1(6.9,46.2) 7.3,45.8 C313.2@7.4,45.8 ; C179.2@6.7,14.8 6.7,15.3 v1(6.8,15.4) ; R210.1@6.7,41.9 6.7,42.3 v1(6.9,42.5) ; v1(6.9,28.6) 7.4,28.6 R337.1@7.6,28.8 ; Q4.2@7.15,16.75 7.3,16.9 v1(7.9,16.9) ; v1(7.2,1.6) 7.7,1.1 R174.1@8,1.1 ; v1(7.8,27) R338.1@7.8,27.6 ; v1(8.4,7.2) R393.1@9.1,7.2 ; v1(8.6,12.2) C210.2@9.2,12.2 ; v1(9.1,77.9) 9.2,77.8 R102.1@9.2,77.3 ; C177.2@9.2,10.2 9.5,10.2 v1(9.8,9.9) ; C275.1@9.2,79.5 v1(9.2,80.1) ; v1(9.5,71) 10.1,71.6 C276.1@10.1,71.7 ; v1(9.8,91.1) R406.1@10.4,90.5 ; C181.2@9.9,69.6 9.9,69.8 v1(10.3,70.2) ; R400.1@10.4,88 10.4,88.4 v1(10.6,88.6) ; R407.1@10.4,91.6 v1(10.4,92.3) ; v1@10.4,92.2 10.4,92.7 R408.1@10.5,92.8 ; v1(10.8,17.7) 10.9,17.8 R396.1@11.6,17.8 ; v1(10.8,35) 11.3,35 R343.1@11.6,35.3 ; v1(11,22.3) 11.3,22.6 R395.1@11.6,22.6 ; v1(11,49.3) 11.1,49.4 C298.1@11.6,49.4 ; C230.1@11.5,3.3 11.8,3.3 v1(12.1,3) ; v1(11.5,59.8) 11.7,59.8 C314.2@12.1,59.4 ; v1(11.85,0.85) 11.95,0.95 U16.3@12.55,0.95 ; v1(12.1,86.3) R401.1@12.7,86.3 ; v1(12.2,52.55) 13,51.75 Q13.2@13.05,51.75 ; v1@12.22,37.8 12.7,37.32 C89.2@12.7,37.2 ; v1(12.4,39.5) 12.7,39.5 12.95,39.75 U8.3@12.95,40.25 ; R394.1@12.55,20.55 R394.1@12.6,20.6 12.6,20.1 v1(12.7,20) ; v1(12.7,23.5) 12.8,23.6 C395.2@12.8,24 ; R402.1@12.7,93.8 v1(13.4,93.8) ; v1(13.6,0.8) 13.8,0.8 R305.1@14.2,1.2 ; R344.1@13.9,37 13.9,36.5 v1(14.1,36.3) ; v1(14,72.9) 14,72.8 14.55,72.25 C186.2@14.55,72 ; C194.2@14.9,59.65 15.15,59.65 15.7,60.2 v1(15.7,60.45) ; v1(15.4,55.8) 15.4,56.142 16.1,56.842 C153.2@16.1,57.2 ; v1(15.47,46.4) 15.9,45.97 R58.1@15.9,45.8 ; Q9.2@16.35,47.55 16.85,47.55 17.2,47.9 v1@17.2,48.4 ; v1(17.2,48.5) v1@17.2,48.4 ; R175.1@17.9,48.2 17.4,48.2 v1@17.2,48.4 ; v1(18.3,50.7) 18.4,50.8 C209.2@18.4,51.3 ; C137.2@19.275,48.025 19.25,48.05 C137.2@19.3,48.05 ; C192.2@20.3,67.3 20.4,67.3 v1(20.8,67.7) ; v1(20.7,3.8) 21.1,4.2 R296.1@21.3,4.2 ; R37.1@20.8,38.4 21.5,38.4 v1(21.6,38.5) ; v1(21,72.4) 21.3,72.7 C272.1@21.7,72.7 ; C78.2@21.3,37.3 21.3,36.9 v1(21.6,36.6) ; v1(22.4,53.7) 22.4,53.25 C128.2@22.75,52.9 ; C274.1@22.8,76.1 22.8,75.6 v1(23,75.4) ; C372.2@22.9,24.9 v1(22.9,25.4) C373.2@22.9,26 ; R199.1@23.3,2.2 23.4,2.2 v1(24.1,1.5) ; C224.1@23.4,17.7 23.6,17.7 v1(23.9,18) ; C223.1@23.5,21 23.7,21 24,20.7 v1(24,20.55) 24.7,20.55 Y5.4@24.85,20.4 ; C141.2@24,38.65 24.65,38.65 v1(24.8,38.5) ; Y5.4@24.8,20.35 Y5.4@24.85,20.3 ; v1(25.1,92.4) 25.4,92.1 C273.2@25.4,91.9 ; C129.2@25.6,57.35 26.05,57.35 v1(26.4,57.7) ; Y5.2@26.55,18.1 26.65,18.2 v1(27.45,18.2) ; C344.2@27.9,30 28.35,30 v1(28.95,29.4) C380.2@29.8,29.4 ; C337.2@28.1,21.3 v1(28.6,21.3) ; C338.2@29.1,20.7 29.1,20.8 v1(28.6,21.3) ; C341.2@29.1,21.9 29.1,21.8 v1(28.6,21.3) ; R166.1@29.5,60 29.5,59.4 v1(29.6,59.3) ; R164.1@30.2,58.5 30.2,58.3 v1(29.6,57.7) 30.4,56.9 C147.2@30.4,56.65 ; C262.2@31.1,20.7 31.1,20.8 v1(31.55,21.25) 31.1,21.7 C343.2@31.1,21.8 ; v1(31.3,10.3) 31.65,10.65 Q3.2@32.25,10.65 ; C247.2@31.5,37.4 v1(31.5,38) ; C208.2@33.5,44.9 33.658,44.9 34.4,44.158 v1(34.4,44.1) ; v1(33.8,61.8) 33.9,61.7 R163.1@33.9,61.1 ; v1(34.8,28.4) 35.2,28.8 R265.1@35.2,29.1 R265.1@35.2,29.2 ; C376.2@35.05,26 35.1,26.05 v1(35.1,27) ; J15.50@36,23.6 36,24.6 v1(36.4,25) ; v1(36.1,74.8) 36.1,74.1 R157.1@36.4,73.8 ; R346.1@36.4,63.7 36.6,63.7 v1(37,64.1) ; C265.2@36.6,26.7 37.2,26.7 37.3,26.6 v1@37.4,26.6 ; U33.3@36.95,78.05 36.95,77.45 v1(37,77.4) ; v1(37,87.1) 37.7,86.4 R182.2@37.8,86.4 ; C414.2@37.1,81.1 37.1,80.8 37.35,80.55 v1(37.6,80.55) ; v1(37.4,26.5) 37.6,26.7 C261.2@38,26.7 ; C266.2@38.6,13.375 38.8,13.575 v1(38.8,14) J15.43@38.8,15.4 ; C400.2@39.4,31 39.95,31 v1(40,31.05) 40.05,31 C401.2@40.6,31 ; J12.10@39.6,6.6 39.6,7.65 v1(39.8,7.85) 40,8.05 C296.2@40,8.4 ; C216.2@39.9,87.7 39.9,87.2 v1(40,87.1) ; J15.40@40,23.6 40,24.8 v1(40.2,25) ; J15.37@41.2,15.4 41.2,16.8 v1(41.5,17.1) ; C263.2@41.6,13.375 v1(41.6,14) 42,14.4 J15.35@42,15.4 ; v1(42,5) 42.6,5.6 J12.7@42.6,6.6 ; v1(42,22.2) 42.4,22.6 J15.34@42.4,23.6 ; C402.2@42.6,30.4 42.6,29.9 v1(42.7,29.8) ; J15.29@44.4,15.4 v1(44.4,16.8) ; C260.2@44.4,26 44.4,25.55 v1(44.55,25.4) ; C252.2@44.6,82.9 44.9,82.6 v1(44.9,82.2) ; J15.27@45.175,15.375 J15.27@45.2,15.4 v1(45.2,14) ; J12.4@45.6,6.6 45.6,5.5 v1(45.9,5.2) ; v1@45.6,22.3 J15.26@45.6,23.6 J15.26@45.7,23.7 ; J15.21@47.6,15.4 47.6,16.7 v1(47.7,16.8) ; v1(48.2,5.2) 48.6,5.6 J12.1@48.6,6.6 ; J15.18@48.8,23.6 J15.18@48.8,23.8 ; C383.2@50.7,27.9 51.1,27.9 v1(51.3,27.7) ; v1(51.5,14.2) 51.7,14.4 C282.2@51.7,14.8 ; C235.2@52.2,87.6 v1(52.2,88.3) ; C293.2@52.8,6.7 53,6.7 v1(53.3,6.4) ; J15.15@53.2,15.4 53.2,16.7 v1(53.3,16.8) ; D20.3@53.5,77.8 v1(53.5,78.7) ; C218.2@54.9,26 v1(54.9,26.8) ; v1(55.1,83.4) D17.3@55.1,84.2 ; J15.9@55.6,15.4 v1(55.6,16.8) ; v1(55.8,1.5) R233.1@56.5,1.5 ; C259.2@56.6,26.7 57,26.7 v1(57.2,26.5) ; v1(56.9,3.1) 57.4,3.6 C289.2@57.4,3.7 ; J15.4@57.6,23.6 v1(57.6,25) ; C295.2@58,10.6 v1(58.6,10.6) ; v1(58.7,77.6) 59.2,78.1 C253.2@59.3,78.1 ; C324.1@59.3,34 v1(59.3,35) ; C287.2@59.4,1.5 v1(60,1.5) ; R231.1@59.4,4.6 v1(59.4,5.2) ; R220.1@60.1,92.1 v1(60.1,92.8) ; U29.3@60.9,27.2 v1(60.9,27.7) ; C288.2@61.4,6.3 61.4,6.8 v1(61.5,6.9) 61.4,7 R230.1@61.4,7.5 ; C415.2@61.4,74.5 61.4,74.1 v1(61.6,73.9) ; R221.1@61.5,92.1 v1(62.2,92.1) ; C405.2@61.9,23.9 61.9,23.6 v1(62.2,23.3) ; v1(62,9.8) 62.3,9.8 C286.2@62.5,9.6 ; U18.4@62.475,39.2 62.475,38.325 v1(62.5,38.3) ; v1(62.7,74) 62.7,75.1 Y4.4@62.725,75.125 ; R310.1@62.8,29.3 62.8,30.05 v1(62.85,30.1) ; C300.2@63.3,43.1 v1(63.9,43.1) ; C303.2@63.3,66.5 63.3,66.9 v1(63.5,67.1) ; R232.1@63.6,10 R232.1@63.7,10 v1(64.4,10) ; C387.2@63.6,17.7 64.1,17.2 v1(64.2,17.2) ; v1(63.9,86.8) 64,86.7 D32.2@64.65,86.7 ; Y4.2@64.475,72.875 64.5,72.9 v1(64.5,74) ; C242.2@64.8,76.5 64.906,76.5 65.5,77.094 v1(65.5,77.1) ; C422.2@64.8,82.8 65.2,82.8 v1(65.5,83.1) ; C301.2@65,66.4 65,66.7 v1(65.2,66.9) ; C394.2@65.7,13.5 65.7,14 v1(65.9,14.2) 66,14.2 66.05,14.15 C325.2@66.7,13.5 ; v1(65.9,70.6) 66,70.7 D31.2@66,71.65 ; D8.2@66,74.7 66.6,74.7 v1(67.1,75.2) ; D4.2@66,79.15 66.35,79.15 v1(66.7,79.5) ; R223.1@66,85.3 66.4,85.3 v1(66.6,85.1) ; C269.2@66.2,77.8 67,77.8 v1(67.1,77.7) ; C302.2@68.5,66.3 v1(69.3,66.3) ; C250.2@68.5,70.8 68.5,70.921 68.035,71.386 68.5,71.851 C251.1@68.5,72 ; R224.1@68.8,69.4 69.3,68.9 v1(69.3,68.7)
  other v1: 48.9,1.1 26,1.5 30.3,1.6 48.9,1.9 33.2,2.1 48.9,2.7 24.1,2.9 26,2.9 33.2,3.8 29.9,5.3 49.8,5.9 32,6.6 0.9,7.2 1.7,7.2 28.5,7.7 7.8,7.8 43.9,8.7 27.6,8.9 4.2,9.1 4.2,9.9 1.2,10 27.6,10.3 63.8,10.7 15.35,11.95 34.5,12.1 31.4,12.2 24.6,12.8 7.4,13.1 32.5,13.1 30.2,15.3 31,15.3 0.9,15.5 1.8,15.5 3.4,16 64.2,16.1 4.2,17.6 38.7,18.1 40.1,18.1 49.5,18.1 50.4,18.1 20.8,18.6 1.1,18.9 31.4,19.8 20.8,19.9 22.85,20.2 33.4,20.6 18.9,21.9 40.5,22.2 17.3,22.3 16.5,22.4 20.25,22.65 25.65,23.8 28,25.2 29.2,25.2 54.2,25.4 43,25.7 26.1,26.2 43,26.4 27.9,26.5 29.4,26.6 27.5,27.2 29.4,27.6 20,28.4 18.7,28.7 32.8,29.3 24.3,29.5 17.1,29.8 32.9,30.1 17.1,30.7 23,30.8 32.9,30.9 12.3,31.1 20.3,31.1 21.5,31.1 43.5,31.3 17.1,31.5 62.6,31.6 30.5,31.8 32.1,31.8 43.5,32.1 39.9,32.35 13.7,32.4 14.7,32.4 20,32.4 30.5,32.6 32.1,32.6 26,32.7 39.9,33.1 26,33.5 14.7,33.6 38.7,33.8 42.8,34 26,34.3 32,35.1 20.8,35.5 31.6,35.8 12.2,37.8 0.6,38.9 43.3,39.6 42.7,40.9 59.4,41 4.95,41.5 59.4,42.2 23.2,43.3 23.2,44.1 26.4,44.1 28,44.1 29.6,44.1 31.2,44.1 32.8,44.1 58.5,44.1 24.8,44.9 27.2,44.9 58.5,44.9 28,45.7 29.6,45.7 63.9,46.4 35.2,46.5 20,47.3 26.4,47.3 28,47.3 31.2,47.3 32.8,47.3 63.9,47.3 47.5,47.6 0.6,47.7 28.8,48.1 32,48.1 35.2,48.1 0.6,48.7 24,48.9 29.6,48.9 0.6,49.7 24.8,50.5 26.4,50.5 28,50.5 29.6,50.5 31.2,50.5 32.8,50.5 35.2,50.5 31.2,52.1 32.8,52.1 35.2,52.1 26.4,52.9 28,52.9 29.6,52.9 34.4,52.9 58.5,53.3 58.9,54.2 14.6,54.3 32.8,54.5 0.6,56.6 58.5,56.7 60,56.7 0.6,57.6 0.6,58.5 7.3,58.8 0.6,59.4 5,60 7.3,60.4 5,61.2 1,62.2 43.6,63.7 13.4,64.7 31.8,65 32.9,65 34.2,65 37.1,65.2 43.8,65.3 14.6,65.4 16.35,65.42 17.28,65.45 61.3,65.6 37.1,66 31.8,66.2 0.6,66.3 58.9,66.5 15,67 16.2,67 13.9,67.3 0.6,67.4 17.3,67.7 10.7,67.8 59.6,68.3 13.9,68.4 66.4,68.6 15,68.7 16,68.7 17.7,68.9 47.3,69.3 23.4,70.4 24.2,70.4 62.8,71.8 64,71.8 61.6,71.9 61.6,72.9 36.2,73 27.9,73.1 35.3,73.9 27.9,74.3 59.9,75.8 8.3,76 9.1,76 58.85,76.3 46.6,78.2 43.1,80.3 12.2,80.6 13.3,81 0.7,81.1 17.6,81.4 19.5,81.8 57.8,83.6 57.8,84.4 0.7,85 3.1,85 5.1,85.1 15.2,85.4 16.5,85.4 19.5,85.5 22.1,85.8 20.6,86 15.8,86.1 17.4,86.5 19,87.05 35,89.1 13.4,89.7 14.4,89.7 38.9,91.8 48.4,92.5 48.4,93.4
GPIO_OR_CLK: J2.7 U1.A17 | length 149.5
  L1 w0.114: v1(17.4,52.1) 19.015,52.1 19.4,51.715 20.385,51.715 U1.A17@20.4,51.7 ; J2.7@65.5,56.48 66.8,55.18 66.8,22.6 v1(67.2,22.2)
  L8 w0.12: v1(17.4,52.1) 17.4,51.744 15.885,50.229 15.885,48.685 14.3,47.1 14.3,46.3 14.5,46.1 14.5,42.8 13.885,42.185 13.885,37.541 13.7,37.356 13.7,35.7 13.9,35.5 13.9,34.4 14.125,34.175 14.125,33.5 14.435,33.19 15.41,33.19 16.656,31.944 17.2,31.944 17.5,31.644 17.5,31 18.1,30.4 18.1,30 19.1,29 19.1,26.744 18.2,25.844 18.2,24.2 19.8,22.6 19.8,21.8 20.415,21.185 20.415,15.385 24.285,11.515 24.285,10.115 27.085,7.315 28.429,7.315 32.329,3.415 33.581,3.415 34.096,2.9 40.1,2.9 40.6,2.4 45.2,2.4 46.8,4 48.3,4 49.4,5.1 52.244,5.1 53.159,6.015 54.915,6.015 56.6,7.7 59.8,7.7 60.7,8.6 62.3,8.6 65.4,11.7 65.4,12.4 63.815,13.985 63.815,16.315 64.2,16.7 64.6,16.7 65.1,17.2 66.2,17.2 66.8,17.8 66.8,21.8 v1(67.2,22.2)
GPIO_OR_PWM_1: J2.29 U1.R22 | length 95.1
  L1 w0.114: v1(31.2,56.1) U1.R22@31.6,55.7
  L3 w0.12: v1(31.2,56.1) 31.2,56.2 30.7,56.7 30.7,57.8 31.2,58.3 31.2,58.756 31.644,59.2 31.644,59.744 31.9,60 31.9,60.756 32.685,61.541 32.685,62.015 32.5,62.2 32.5,64 33.3,64.8 33.3,65.3 34.9,66.9 34.9,67.5 36.3,68.9 36.3,71.5 36.915,72.115 37.7,72.115 38.085,72.5 44.4,72.5 45.7,73.8 46.9,73.8 47.3,74.2 48.444,74.2 48.685,74.441 48.685,74.985 49.3,75.6 53.2,75.6 53.5,75.9 55.49,75.9 56.165,75.225 56.975,75.225 58.825,73.375 58.825,71.963 60.435,70.353 60.435,69.247 60,68.812 60,66.4 v1(59.4,65.8) ; v1(61.1,50.6) 61.7,50 61.7,48.8 61.45,48.55 61.45,46.25 61.6,46.1 61.6,42.7 62.5,41.8 62.5,39.1 62.1,38.7 62.1,38.1 62.4,37.8 62.4,36.116 64,34.516 64,32.7 64.315,32.385 64.315,30.465 65.5,29.28 J2.29@65.5,28.54
  L10 w0.114: v1(59.4,65.8) 59.4,65.544 57.7,63.844 57.7,53.4 60.5,50.6 v1(61.1,50.6)
GPIO_OR_PWM_2: R368.1 R369.1 U1.T25 | length 68.8
  L1 w0.114: v1(31.2,60.9) 31.6,60.5 31.6,59.5 32.4,58.7 U1.T25@32.4,58.1
  L1 w0.16: U1.T25@32.395,58.105 U1.T25@32.4,58.1
  L3 w0.12: v1(31.2,60.9) 31.266,60.9 31.885,61.519 31.885,62 32.1,62.215 32.1,64 32.515,64.415 32.515,65.215 34.5,67.2 34.5,67.7 35.985,69.185 35.985,72.085 37.5,73.6 39.644,73.6 40.129,73.115 44.115,73.115 45.2,74.2 46.756,74.2 48.456,75.9 52.9,75.9 53.2,76.2 55.756,76.2 56.441,75.515 57.21,75.515 59.2,73.525 59.2,72.1 60.725,70.575 60.725,69 60.4,68.675 60.4,66 v1(59.4,65)
  L10 w0.114: v1(59.4,65) 58.115,63.715 58.115,54.385 60,52.5 61.3,52.5 62,51.8 R368.1@62.1,51.8
GPIO_OR_PWM_3: J2.32 U1.B19 | length 89.8
  L1 w0.114: U1.B19@21.2,53.3 v1(21.6,53.7)
  L8 w0.12: v1(21.6,53.7) 22.8,52.5 22.8,50.356 22.529,50.085 22.241,50.085 22.015,49.859 22.015,49.6 21.985,49.57 21.985,49.541 21.759,49.315 21.315,49.315 21.185,49.185 21.185,45.029 19.3,43.144 19.3,41.844 18.915,41.459 18.915,40.929 20.8,39.044 20.8,36.2 21.185,35.815 21.185,34.075 22.615,32.645 22.615,32.341 22.856,32.1 24,32.1 24.2,32.3 28.3,32.3 28.985,31.615 28.985,30.115 30.125,28.975 30.125,27.681 31.4,26.406 31.4,24.1 34.756,20.744 35.1,20.744 36.815,19.029 36.815,18.541 37.156,18.2 37.6,18.2 37.9,18.5 41.4,18.5 42.7,17.2 46.9,17.2 47.2,16.9 47.2,16.656 48.521,15.335 50.065,15.335 50.815,14.585 59.685,14.585 62.615,17.515 62.615,18.509 62.9,18.794 62.9,18.8 63.1,19 63.1,20.4 64.8,22.1 66,22.1 66.8,22.9 66.8,24.76 J2.32@68.04,26
GPIO_OR_PWM_4: J2.33 U1.F17 | length 81.8
  L1 w0.114: v1(24,52.1) U1.F17@24.4,51.7
  L8 w0.12: v1(24,52.1) 23.5,51.6 23.5,50.6 22.815,49.915 22.815,49.571 22.559,49.315 22.155,49.315 21.985,49.145 21.985,44.741 19.615,42.371 19.615,41.541 20.1,41.056 20.1,40.256 21.2,39.156 21.2,36.4 21.6,36 21.6,34.1 22.785,32.915 23.9,32.915 24.085,33.1 28.3,33.1 29.3,32.1 29.3,30.3 30.415,29.185 30.415,28.559 31.8,27.174 31.8,24.8 32.1,24.5 32.4,24.5 33.2,23.7 33.2,23.1 34.94,21.36 35.2,21.36 37.56,19 41.5,19 42.885,17.615 47.429,17.615 48.1,16.944 48.1,16.3 48.665,15.735 50.759,15.735 51.494,15 58.5,15 59.5,16 60.3,16 61.8,17.5 61.8,18.5 62.7,19.4 62.7,20.5 65.5,23.3 J2.33@65.5,23.46
GYRO_CS_B: R317.2 U28.17 | length 1.7
  L1 w0.114: U28.17@41.2,30.225 41.2,29.2 R317.2@41.7,28.7
GYRO_INT: R313.2 R314.2 R410.1 U1.N24 | length 49
  L1 w0.114: U1.N24@30,57.3 30.291,57.3 30.691,56.9 v1(31.2,56.9) ; v1(37.4,36.9) 38,36.3 R410.1@38.5,36.3 R314.2@39.9,36.3 R313.2@41.3,36.3
  L8 w0.12: v1(31.2,56.9) 31.585,56.515 31.585,55.941 31.359,55.715 31.071,55.715 30.815,55.459 30.815,53.415 30.4,53 30.4,51.556 29.729,50.885 29.441,50.885 29.215,50.659 29.215,44.515 28.385,43.685 27.041,43.685 26.815,43.459 26.815,43.171 26.529,42.885 26.241,42.885 26.015,42.659 26.015,39.885 26.2,39.7 26.6,39.7 28.5,37.8 28.5,36.456 29.456,35.5 29.9,35.5 30.815,34.585 30.815,34.141 31.7,33.256 31.7,31.3 v1(32.1,30.9)
  L10 w0.114: v1(32.1,30.9) 32.485,30.515 33.215,30.515 34.1,31.4 34.1,35.244 ; 34.115,35.244 34.115,35.259 34.815,35.959 34.815,36.559 35.156,36.9 v1(37.4,36.9)
GYRO_INT1: R314.1 U28.3 | length 2.2
  L1 w0.114: R314.1@39.9,35.3 40,35.3 40.4,35.3 41.2,34.5 U28.3@41.2,33.975
GYRO_PWR_CTRL: R312.2 R313.1 U28.2 | length 2.9
  L1 w0.114: U28.2@41.7,33.975 41.7,34.5 41.3,34.9 R313.1@41.3,35.3 R312.2@42.7,35.3
GYRO_RST: R318.2 R383.2 U28.4 | length 24
  L1 w0.114: v1(40.7,33.1) U28.4@40.7,33.975
  L10 w0.114: v1(40.7,33.1) 40.7,33.4 41,33.7 42,33.7 42.3,33.4 R383.2@42.3,33.1 42.4,33 42.406,33 42.906,32.5 43.8,32.5 44.2,32.1 52.6,32.1 53.405,32.905 57.91,32.905 58.615,32.2 60.1,32.2 60.815,32.915 61.6,32.915 R318.2@61.6,33
HDMI_CEC: R25.1 U1.W4 | length 9.9
  L1 w0.114: U1.W4@34.8,41.3 35.2,40.9 35.8,40.9 36,40.7 36,38.7 36.535,38.165 36.535,37.709 36.7,37.544 36.7,33.9 36,33.2 R25.1@35.6,33.2
HDMI_CEC_CON: J5.13 R190.2 U12.23 | length 9
  L1 w0.114: J5.13@38,85.44 U12.23@38,82.05 38,80.756 40.7,78.056 R190.2@40.7,77.6
HDMI_CEC_IN: R24.2 R25.2 R118.1 U12.16 | length 63
  L1 w0.114: v1(24,35.7) 24.4,35.3 25.556,35.3 26,35.744 R24.2@26,35.9 26.9,36.8 28.5,36.8 29,36.3 30.344,36.3 30.729,35.915 31.159,35.915 31.429,36.185 32.015,36.185 34,34.2 34,33.8 R25.2@34.6,33.2 ; v1(38,75) U12.16@38,76.35
  L8 w0.12: v1(24,35.7) 24,40.24 23.615,40.625 23.615,42.659 24.671,43.715 24.959,43.715 26.015,44.771 26.015,48.515 26.9,49.4 26.9,51 27.615,51.715 27.615,53.059 27.871,53.315 28.26,53.315 29.215,54.27 29.215,54.659 29.215,55.459 29.441,55.685 29.729,55.685 30,55.956 30,58.2 30.5,58.7 30.5,60.8 31.1,61.4 31.1,61.9 31.62,62.42 31.62,63.731 32.185,64.296 32.185,66.685 33.135,67.635 33.135,68.421 32.815,68.741 32.815,69.059 33.015,69.259 33.015,70.259 34.2,71.444 34.2,73.5 35.1,74.4 37.4,74.4 v1(38,75)
  L10 w0.114: v1(38,75) 38.1,75.1 R118.1@38.6,75.1
HDMI_CLK_N: J5.12 U1.J5 U12.15 U12.24 | length 55.2
  L1 w0.1: v1(26.4,41.7) U1.J5@26.8,42.1 ; J5.12@37.5,85.44 37.5,84.09 37.16,83.75 37.16,83.47 37.5,83.13 U12.24@37.5,82.05 37.5,81.3 37.16,80.96 37.16,77.77 37.5,77.43 U12.15@37.5,76.35 37.5,75.6 37.16,75.26 37.16,74.983 37.783,74.36 38.893,74.36 39.46,73.793 39.46,73.24 v1(39.6,73.1)
  L8 w0.11: v1(26.4,41.7) 28.22,41.7 28.9,42.38 29.733,42.38 30.72,43.367 30.72,48.32 31.1,48.7 31.712,48.7 32.32,49.308 32.32,54.82 32.72,55.22 32.72,60.12 33.285,60.685 33.285,63.485 33.694,63.894 33.694,65.241 36.3,67.847 36.3,71.025 36.975,71.7 38.953,71.7 39.46,72.207 39.46,72.96 v1(39.6,73.1)
HDMI_CLK_P: J5.10 U1.J6 U12.13 U12.26 | length 55.2
  L1 w0.1: v1(26.4,42.5) U1.J6@26.8,42.9 ; J5.10@36.5,85.44 36.5,84.09 36.84,83.75 36.84,83.47 36.5,83.13 U12.26@36.5,82.05 36.5,81.3 36.84,80.96 36.84,77.77 36.5,77.43 U12.13@36.5,76.35 36.5,75.6 36.84,75.26 36.84,74.851 37.651,74.04 38.76,74.04 39.14,73.66 39.14,73.24 v1(39,73.1)
  L8 w0.11: v1(26.4,42.5) 26.4,42.393 26.773,42.02 28.088,42.02 28.768,42.7 29.6,42.7 30.4,43.5 30.4,43.9 30.075,44.225 30.075,44.675 30.4,45 30.4,48.453 30.967,49.02 31.58,49.02 32,49.44 32,54.953 32.4,55.353 32.4,60.253 32.965,60.818 32.965,63.618 33.374,64.026 33.374,65.374 35.98,67.98 35.98,71.158 36.842,72.02 38.82,72.02 39.14,72.34 39.14,72.96 v1(39,73.1)
HDMI_D0_N: J5.9 U1.K5 U12.12 U12.27 | length 57.5
  L1 w0.1: v1(27.2,42.5) U1.K5@27.6,42.1 ; J5.9@36,85.44 36,83.75 35.66,83.41 35.66,83.14 36,82.8 U12.27@36,82.05 36,80.97 35.66,80.63 35.66,77.77 36,77.43 U12.12@36,76.35 36,75.6 35.66,75.26 35.66,74.583 36.983,73.26 38.083,73.26 39.36,71.983 39.36,70.94 v1(39.5,70.8)
  L3 w0.11: v1(27.2,42.5) 27.72,41.98 28.5,41.98 28.9,42.38 29.733,42.38 30.8,43.447 30.8,47.153 30.52,47.433 30.52,48.367 31.033,48.88 31.908,48.88 32.42,49.392 32.42,50.38 32.1,50.7 32.1,55.447 32.8,56.147 32.8,57.847 33.9,58.947 33.9,60.847 34.5,61.447 34.5,62.947 35.24,63.687 35.24,64.64 35.58,64.98 36.133,64.98 36.7,65.547 36.7,66.4 38.68,68.38 40.233,68.38 40.82,68.967 40.82,69.733 40.353,70.2 39.5,70.2 39.36,70.34 39.36,70.66 v1(39.5,70.8)
HDMI_D0_P: J5.7 U1.K6 U12.10 U12.29 | length 57.5
  L1 w0.1: U1.K6@27.6,42.9 v1(28,42.5) ; J5.7@35,85.44 35,83.75 35.34,83.41 35.34,83.14 35,82.8 U12.29@35,82.05 35,80.97 35.34,80.63 35.34,77.77 35,77.43 U12.10@35,76.35 35,75.6 35.34,75.26 35.34,74.451 36.851,72.94 37.951,72.94 39.04,71.851 39.04,70.94 v1(38.9,70.8)
  L3 w0.11: v1(28,42.5) 28.2,42.3 28.368,42.3 28.768,42.7 29.6,42.7 30.48,43.58 30.48,44 30.34,44.14 30.097,44.14 29.937,44.3 29.937,44.6 30.097,44.76 30.34,44.76 30.48,44.9 30.48,45.65 30.34,45.79 30.097,45.79 29.937,45.95 29.937,46.25 30.087,46.4 30.33,46.4 30.48,46.55 30.48,47.02 30.2,47.3 30.2,48.5 30.9,49.2 31.775,49.2 32.1,49.525 32.1,50.247 31.78,50.567 31.78,55.58 32.48,56.28 32.48,57.98 33.58,59.08 33.58,60.98 34.18,61.58 34.18,63.08 34.92,63.82 34.92,64.773 35.447,65.3 36,65.3 36.38,65.68 36.38,66.533 38.547,68.7 40.1,68.7 40.5,69.1 40.5,69.6 40.22,69.88 39.367,69.88 39.04,70.207 39.04,70.66 v1(38.9,70.8)
HDMI_D1_N: J5.6 U1.J3 U12.9 U12.30 | length 55.2
  L1 w0.1: v1(26.4,40.1) U1.J3@26.8,40.5 ; J5.6@34.5,85.44 34.5,84.09 34.16,83.75 34.16,83.47 34.5,83.13 U12.30@34.5,82.05 34.5,81.3 34.16,80.96 34.16,77.44 34.5,77.1 U12.9@34.5,76.35 34.5,75.27 34.16,74.93 34.16,74.193 36.093,72.26 36.693,72.26 37.66,71.293 37.66,70.94 v1(37.8,70.8)
  L8 w0.11: v1(26.4,40.1) 28.981,40.1 31.301,42.42 32.124,42.42 33.919,44.215 33.919,59.167 34.6,59.847 34.6,63.147 35.24,63.787 35.24,64.787 37.66,67.207 37.66,70.66 v1(37.8,70.8)
HDMI_D1_P: J5.4 U1.J4 U12.7 U12.32 | length 55.2
  L1 w0.1: v1(26.4,40.9) U1.J4@26.8,41.3 ; J5.4@33.5,85.44 33.5,84.09 33.84,83.75 33.84,83.47 33.5,83.13 U12.32@33.5,82.05 33.5,81.3 33.84,80.96 33.84,77.44 33.5,77.1 U12.7@33.5,76.35 33.5,75.27 33.84,74.93 33.84,74.06 35.96,71.94 36.56,71.94 37.34,71.16 37.34,70.94 v1(37.2,70.8)
  L8 w0.11: v1(26.4,40.9) 26.4,40.793 26.773,40.42 28.848,40.42 29.128,40.7 29.128,41.153 29.375,41.4 29.828,41.4 31.168,42.74 31.992,42.74 33.599,44.348 33.599,59.299 34.28,59.98 34.28,63.28 34.92,63.92 34.92,64.92 37.34,67.34 37.34,70.66 v1(37.2,70.8)
HDMI_D2_N: J5.3 U1.K3 U12.6 U12.33 | length 57.5
  L1 w0.1: v1(27.2,40.9) U1.K3@27.6,40.5 ; J5.3@33,85.44 33,83.75 32.66,83.41 32.66,83.14 33,82.8 U12.33@33,82.05 33,80.97 32.66,80.63 32.66,77.77 33,77.43 U12.6@33,76.35 33,75.6 32.66,75.26 32.66,73.693 35.133,71.22 35.533,71.22 36.82,69.933 36.82,68.923 37.083,68.66 37.693,68.66 38.36,67.993 38.36,66.94 v1(38.5,66.8)
  L3 w0.11: v1(27.2,40.9) 27.43,40.67 27.43,40.317 27.867,39.88 28.761,39.88 31.301,42.42 32.124,42.42 33.7,43.996 33.7,44.747 34.2,45.247 34.2,46 33.62,46.58 33.62,47.967 34.145,48.492 34.145,49.355 33.599,49.901 33.599,54.9 34.02,55.321 34.02,57.267 35.1,58.347 35.1,60.3 35.658,60.858 35.658,61.706 37.8,63.847 37.8,65.547 38.36,66.107 38.36,66.66 v1(38.5,66.8)
HDMI_D2_P: J5.1 U1.K4 U12.4 U12.35 | length 57.5
  L1 w0.1: U1.K4@27.6,41.3 v1(28,40.9) ; J5.1@32,85.44 32,83.75 32.34,83.41 32.34,83.14 32,82.8 U12.35@32,82.05 32,80.97 32.34,80.63 32.34,77.77 32,77.43 U12.4@32,76.35 32,75.6 32.34,75.26 32.34,73.56 35,70.9 35.4,70.9 36.5,69.8 36.5,68.791 36.951,68.34 37.56,68.34 38.04,67.86 38.04,66.94 v1(37.9,66.8)
  L3 w0.11: v1(28,40.9) 27.9,40.9 27.75,40.75 27.75,40.45 28,40.2 28.628,40.2 29.128,40.7 29.128,40.928 28.939,41.118 28.939,41.301 29.155,41.518 29.339,41.518 29.528,41.328 29.757,41.328 31.168,42.74 31.992,42.74 32.38,43.128 32.38,43.505 32.595,43.72 32.972,43.72 33.38,44.128 33.38,44.88 33.88,45.38 33.88,45.867 33.3,46.447 33.3,48.1 33.825,48.625 33.825,49.223 33.279,49.768 33.279,55.033 33.7,55.453 33.7,57.4 34.78,58.48 34.78,60.433 35.338,60.991 35.338,61.838 37.48,63.98 37.48,65.68 38.04,66.24 38.04,66.66 v1(37.9,66.8)
HDMI_DDC: R24.1 R26.2 U1.K2 | length 8.6
  L1 w0.114: R24.1@25,35.9 24.6,36.3 R26.2@23.9,36.3 23.9,36.344 23.3,36.944 23.3,37.7 23.685,38.085 26.885,38.085 27.2,38.4 27.2,39.3 U1.K2@27.6,39.7
HDMI_ESD_BYP: C215.1 U12.37 | length 3.1
  L1 w0.28: 30.4,83.3 30.7,83.3 31,83 U12.37@31,82.05 U12.37@31,81.75
  L1 w0.4: C215.1@29.4,83 29.7,83.3 30.4,83.3
HDMI_HPD: R23.2 R357.2 U33.4 | length 5.6
  L10 w0.114: U33.4@36.95,79.95 36.95,79.25 36,78.3 R23.2@36,76.5 36.1,76.5 37.1,75.5 R357.2@37.3,75.5
HDMI_HPD_BUFF: R356.1 R357.1 U12.19 U33.2 | length 8
  L1 w0.114: v1(39.3,78.5) 39.985,77.815 39.985,76.835 U12.19@39.5,76.35
  L10 w0.114: R356.1@38.6,76.4 38.1,76.4 38,76.5 R357.1@37.3,76.5 37.3,77 37.6,77.3 U33.2@37.6,78.05 37.6,78.5 37.8,78.7 39.1,78.7 v1(39.3,78.5)
HDMI_HPD_CON: C217.1 J5.19 R47.2 U12.20 | length 4.5
  L1 w0.114: U12.20@39.6,81.7 R47.2@40.5,81.7 C217.1@40.5,83 41,83.5 J5.19@41,85.14
HDMI_HPD_R: C207.1 R21.1 R23.1 R157.2 U1.K1 | length 55
  L1 w0.114: v1(25.3,36.6) 25.8,36.6 26.3,37.1 C207.1@26.3,37.2 26.3,37.5 26.585,37.785 27.085,37.785 27.6,38.3 U1.K1@27.6,38.9
  L8 w0.12: v1(25.3,36.6) 25.3,38.544 24.944,38.9 24.656,38.9 24.415,39.141 24.415,42.659 24.641,42.885 24.929,42.885 25.215,43.171 25.215,43.459 26.271,44.515 26.559,44.515 26.785,44.741 26.785,45.255 27.2,45.67 27.2,48.8 27.5,49.1 27.5,50.544 27.856,50.9 28.4,50.9 28.7,51.2 28.7,53.344 29.471,54.115 29.759,54.115 30,54.356 30,55.436 30.3,55.736 30.3,57.3 30.8,57.8 30.8,60.244 31.041,60.485 31.329,60.485 31.9,61.056 31.9,63.615 32.465,64.18 32.465,66.465 33.585,67.585 33.585,69.455 33.815,69.685 33.815,70.315 34.6,71.1 34.6,72.3 35.8,73.5 36.9,73.5 37.4,73 v1(37.4,72.5)
  L10 w0.114: R23.1@36,75.5 36.1,75.5 37.4,74.2 R157.2@37.4,73.8 R21.1@38.6,73.8 38.6,73 38.1,72.5 v1(37.4,72.5)
HDMI_RESREF: R32.2 U1.J1 | length 2
  L1 w0.4: v1(26.4,38.5) U1.J1@26.8,38.9
  L10 w0.3: R32.2@25.865,37.3 25.865,37.9 26.4,38.435 v1(26.4,38.5)
HDMI_SCL_CON: J5.15 R183.1 | length 5.9
  L1 w0.114: v1(38.5,88) 39,87.5 J5.15@39,85.44
  L10 w0.114: R183.1@38.3,85.3 38.65,85.65 38.65,86.45 38.92,86.72 38.92,87.58 v1(38.5,88)
HDMI_SCL_CON_R: R183.2 R188.1 U12.22 | length 5
  L1 w0.114: v1(38.4,83.6) 38.5,83.5 U12.22@38.5,82.05
  L10 w0.114: R188.1@36.1,85.4 37.2,85.4 R183.2@37.3,85.3 37.3,84.7 v1(38.4,83.6)
HDMI_SDA_CON: J5.16 R184.1 | length 4.5
  L1 w0.114: v1(39.3,88) 39.5,87.8 J5.16@39.5,85.44
  L10 w0.114: v1(39.3,88) 39.3,86.9 39.5,86.7 R184.1@39.5,86.2
HDMI_SDA_CON_R: R184.2 R187.1 U12.21 | length 4.7
  L1 w0.114: U12.21@39,82.05 v1(39,83.1)
  L10 w0.114: v1(39,83.1) 39,84.7 R184.2@39.5,85.2 R187.1@40.8,85.2